# Altium PCB RemoteSensorUnit-v1.0.PcbDoc (part 3 of 5)
Units mm, origin at the board's own origin, x right, y up, seen from the top; angles counter-clockwise.
Board outline 80 x 114 mm, 2 copper layers (Top Layer, Bottom Layer), stack 1.448 mm thick; 163 components, 122 nets, 631 pads, 300 vias.
Unrouted connection lines stored in the file: 147.
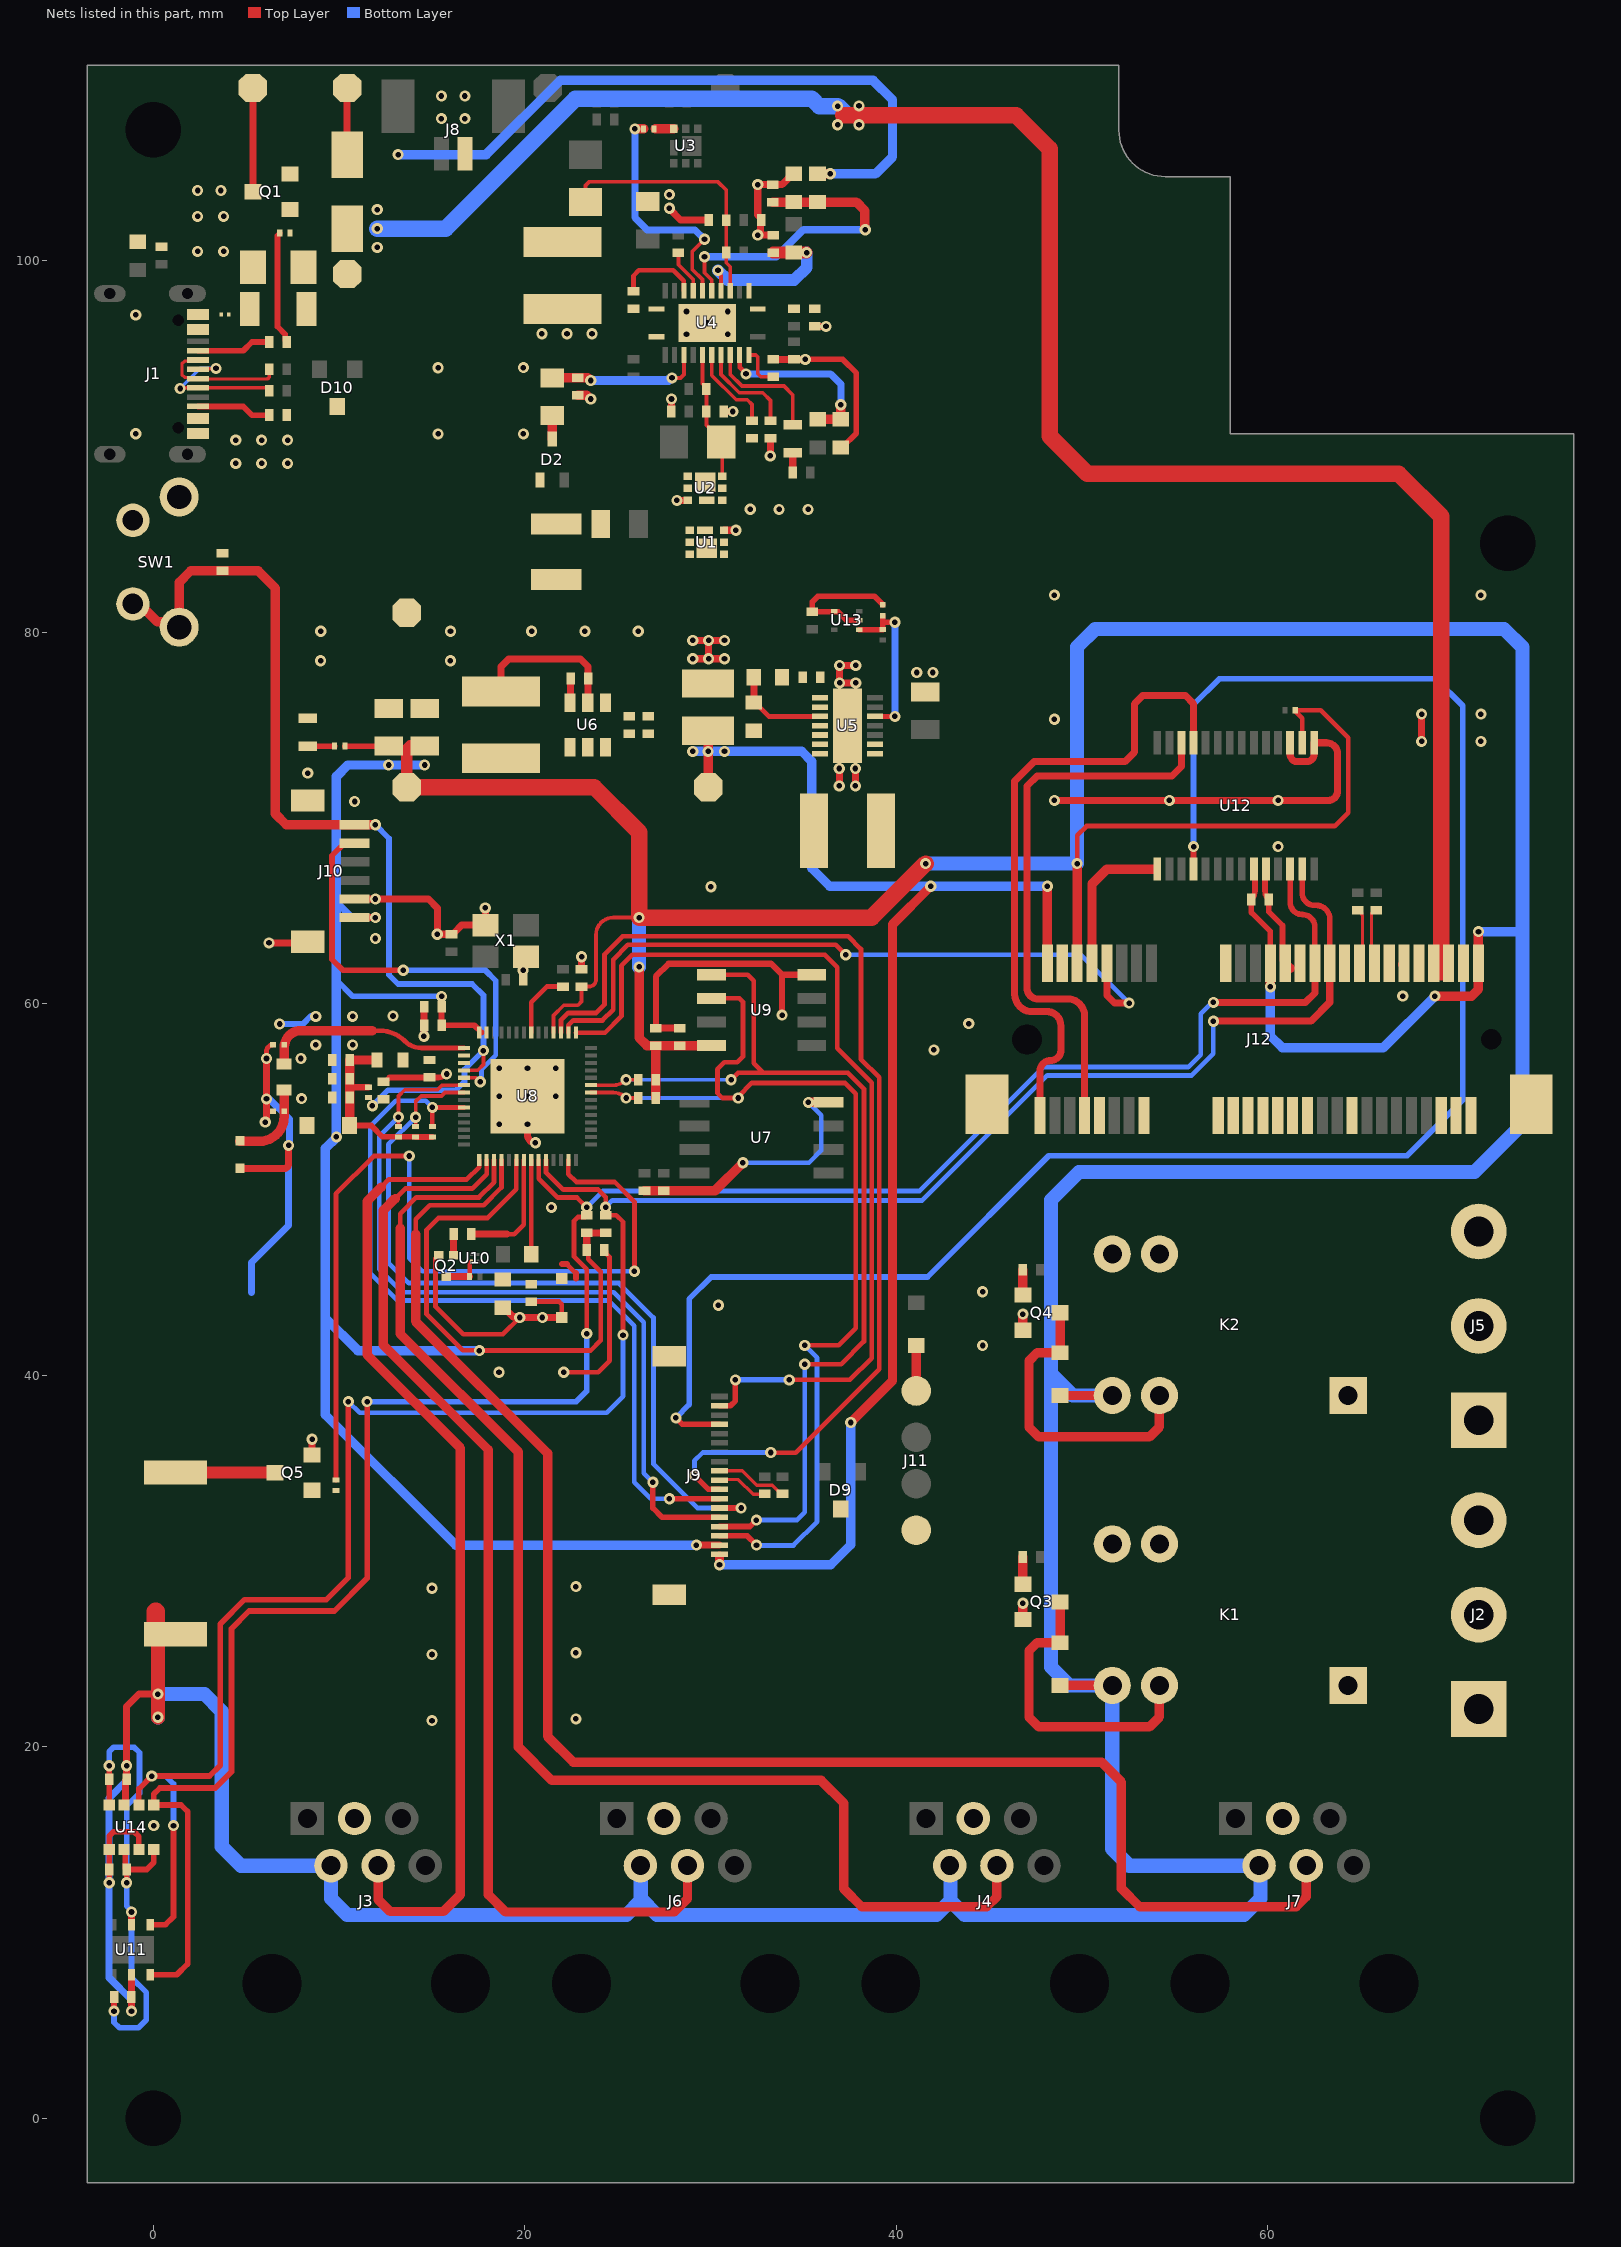
[diagram p2: the nets of this part, all layers, seen from the top]

## Part data (continued)
R7: library part RT0402BRD07232KL, "RES 232K OHM 0.1% 1/16W 0402", LCSC Part Number=C852652, Manufacturer=Yageo, Supplier Part Number=603-RT0402BRD07232KL, Category="Chip SMD Resistors", ComponentLink1Description=https://datasheet.octopart.com/RT0402BRD07232KL-Yageo-datasheet-166250672.pdf?src-supplier=Future+Electronics, ComponentLink1URL=https://datasheet.octopart.com/RT0402BRD07232KL-Yageo-datasheet-166250672.pdf?src-supplier=Future+Electronics, Item Type=Resistor, Manufacturer Part Number=RT0402BRD07232KL, Pricing="1=0.47, 10=0.338, 50=0.338, 100=0.135, 1000=0.067, 10000=0.048 (USD)", RoHS=Yes, Stock=9850, Supplier=Mouser
R8: library part PA1206FRF470R02L, "RES 0.02 OHM 1% 1W 1206", LCSC Part Number=C728292, Manufacturer=Yageo, Supplier Part Number=58AK7653, Category="Chip SMD Resistors", Item Type=Resistor, Manufacturer Part Number=PA1206FRF470R02L, Pricing="1=0.541 (USD)", RoHS=No, Stock=4000, Supplier=Avnet
R9: library part RC0402FR-0743KL, "RES 43K OHM 1% 1/16W 0402", Case Code (Imperial)=0402, Case Code (Metric)=1005, LCSC Part Number=C185415, Manufacturer=Yageo, Max Operating Temperature=155°C, Max Power Dissipation=63mW, Min Operating Temperature=-55°C, Package Quantity=1, Resistance=43kR, Resistance Tolerance=1%, Resistor Type="Thick Film", Supplier Part Number 1=311-43.0KLRCT-ND, Temperature Coefficient=100ppm/°C, Voltage Rating=50V, Case/Package=0402, Category="Chip SMD Resistors", ComponentLink1Description=https://datasheet.ciiva.com/11819/0900766b80c66297-11819515.pdf?src-supplier=RSComponents, ComponentLink1URL=https://datasheet.ciiva.com/11819/0900766b80c66297-11819515.pdf?src-supplier=RSComponents, ComponentLink2Description=https://datasheet.ciiva.com/7850/1018594-7850009.pdf?src-supplier=Element14, ComponentLink2URL=https://datasheet.ciiva.com/7850/1018594-7850009.pdf?src-supplier=Element14, ComponentLink3Description=https://datasheet.ciiva.com/7850/1018594-7850008.pdf?src-supplier=Element14, ComponentLink3URL=https://datasheet.ciiva.com/7850/1018594-7850008.pdf?src-supplier=Element14, ComponentLink4Description=https://datasheet.ciiva.com/2453/pyu-r-int-thick-7-2453665.pdf?src-supplier=Digi-Key, ComponentLink4URL=https://datasheet.ciiva.com/2453/pyu-r-int-thick-7-2453665.pdf?src-supplier=Digi-Key, ComponentLink5Description=https://datasheet.ciiva.com/2453/pyu-r-int-thick-7-2453666.pdf?src-supplier=Digi-Key, ComponentLink5URL=https://datasheet.ciiva.com/2453/pyu-r-int-thick-7-2453666.pdf?src-supplier=Digi-Key, ComponentLink6Description=https://datasheet.ciiva.com/2453/pyu-r-int-thick-7-2453664.pdf?src-supplier=Digi-Key, ComponentLink6URL=https://datasheet.ciiva.com/2453/pyu-r-int-thick-7-2453664.pdf?src-supplier=Digi-Key, Construction=Rectangular, Depth=0.5mm, Features="Moisture Resistant", Height=0.016inch, Item Type=Resistor, Lead Free="Lead Free", Length=1mm, Manufacturer Part Number=RC0402FR-0743KL, Military Standard=Not, Number of Terminations=2, Packaging="Tape and Reel", Power Rating=63mW, Pricing 1="1=0.10000, 10=0.01400, 100=0.00580, 1000=0.00262, 2500=0.00228, 5000=0.00188 (USD)", RoHS=Yes, RoHS Compliant=Yes, Series=RC, Size Code=0402, Stock 1=923044, Supplier 1=Digi-Key, Technology="THICK FILM", Termination=SMD/SMT, Tolerance=1%, Voltage Rating (DC)=50V, Weight=2.3E-05oz, Width=0.02inch
R10: library part RT0402BRD0715KL, "RES SMD 15K OHM 0.1% 1/16W 0402", LCSC Part Number=C852545, Manufacturer=Yageo, Category="Chip SMD Resistors", ComponentLink1Description=https://datasheet.ciiva.com/12723/pyu-rt-1-to-0-05-rohs-l-4-12723782.pdf?src-supplier=Mouser, ComponentLink1URL=https://datasheet.ciiva.com/12723/pyu-rt-1-to-0-05-rohs-l-4-12723782.pdf?src-supplier=Mouser, ComponentLink2Description=https://datasheet.ciiva.com/2582/pyu-rt-1-to-0-05-rohs-l-5-2582151.pdf?src-supplier=Digi-Key, ComponentLink2URL=https://datasheet.ciiva.com/2582/pyu-rt-1-to-0-05-rohs-l-5-2582151.pdf?src-supplier=Digi-Key, Item Type=Resistor, Manufacturer Part Number=RT0402BRD0715KL, Pricing="10000=0.0361, 30000=0.0357, 50000=0.0243, 100000=0.0205 (USD)", RoHS=Yes, Stock=10000, Supplier="Arrow Electronics", Supplier Part Number=RT0402BRD0715KL
R11 R22 R29 R34 R35 R36 R43: library part RC0201FR-0710KL, "RES SMD 10K OHM 1% 1/20W 0201", LCSC Part Number=C106225, Manufacturer=Yageo, Package=0201, ComponentLink7Description=LCSC, ComponentLink7URL=https://www.lcsc.com/product-detail/Chip-Resistor-Surface-Mount_YAGEO-RC0201FR-0710KL_C106225.html, Item Type=Resistor, Manufacturer Part Number=RC0201FR-0710KL
R12 R38 R44: library part RC0201FR-071KP, "RES 1K OHM 1% 1/20W 0201", LCSC Part Number=C3953443, Manufacturer=Yageo, Supplier Part Number 1=13-RC0201FR-071KPCT-ND, Manufacturer Part Number=RC0201FR-071KP, Pricing 1="1=0.11000, 10=0.10200, 100=0.03940, 1000=0.01734, 2500=0.01497, 5000=0.01340 (USD)", RoHS=Yes, RoHS Compliant=Yes, Stock 1=4800, Supplier 1=Digi-Key
R13: library part TNPW080510R0FEEA, "RES 10 OHM 1% 1/8W 0805", Case Code (Imperial)=0805, Case Code (Metric)=2012, LCSC Part Number=C844061, Manufacturer=Vishay, Max Operating Temperature=125°C, Min Operating Temperature=-55°C, Power Rating=125mW, Resistor Type="Thin Film", Supplier Part Number 1=71-TNPW080510R0FEEA, Temperature Coefficient=25ppm/°C, Tolerance=1%, Voltage Rating=150V, Case/Package=0805, Category="Chip SMD Resistors", ComponentLink1Description=https://datasheet.ciiva.com/16787/70201627-16787918.pdf?src-supplier=Allied+Electronics, ComponentLink1URL=https://datasheet.ciiva.com/16787/70201627-16787918.pdf?src-supplier=Allied+Electronics, Contact Plating=Tin, Depth=1.25mm, Height=0.45mm, Item Type=Resistor, Lead Free="Lead Free", Length=2mm, Manufacturer Part Number=TNPW080510R0FEEA, Mounting Technology="Surface Mount", Packaging="Tape and Reel", Pricing 1="1=0.57000, 10=0.43800, 50=0.43800, 100=0.18500, 500=0.13400, 1000=0.10200, 2500=0.09600, 5000=0.08500, 10000=0.08500 (USD)", Radiation Hardening=No, RoHS=Yes, RoHS Compliant=Yes, Series="TNPW e3", Stock 1=22670, Supplier 1=Mouser, Technology="THIN FILM", Termination=SMD/SMT, Weight=0.000194oz, Width=1.2mm
R15 R16: library part RC0402FR-074K02L, "RES 4.02K OHM 1% 1/16W 0402", Case Code (Imperial)=0402, Case Code (Metric)=1005, LCSC Part Number=C137968, Manufacturer=Yageo, Max Operating Temperature=155°C, Max Power Dissipation=63mW, Min Operating Temperature=-55°C, Package Quantity=1, Power Rating=62.5mW, Resistance=4.02kR, Resistor Type="Thick Film", Supplier Part Number 1=603-RC0402FR-074K02L, Temperature Coefficient=100ppm/°C, Tolerance=1%, Voltage Rating=50V, Case/Package=0402, Category="Chip SMD Resistors", ComponentLink1Description=https://datasheet.ciiva.com/2553/pyu-r-int-thick-7-2553258.pdf?src-supplier=Digi-Key, ComponentLink1URL=https://datasheet.ciiva.com/2553/pyu-r-int-thick-7-2553258.pdf?src-supplier=Digi-Key, ComponentLink2Description=https://datasheet.ciiva.com/2553/pyu-r-int-thick-7-2553259.pdf?src-supplier=Digi-Key, ComponentLink2URL=https://datasheet.ciiva.com/2553/pyu-r-int-thick-7-2553259.pdf?src-supplier=Digi-Key, ComponentLink3Description=https://datasheet.ciiva.com/2553/pyu-r-int-thick-7-2553257.pdf?src-supplier=Digi-Key, ComponentLink3URL=https://datasheet.ciiva.com/2553/pyu-r-int-thick-7-2553257.pdf?src-supplier=Digi-Key, ComponentLink4Description=https://datasheet.ciiva.com/12668/pyu-rc0402-51-rohs-l-6-r-12668204.pdf?src-supplier=Mouser, ComponentLink4URL=https://datasheet.ciiva.com/12668/pyu-rc0402-51-rohs-l-6-r-12668204.pdf?src-supplier=Mouser, ComponentLink5Description=https://datasheet.ciiva.com/16741/pyu-rc0402-51-rohs-l-6-r-16741438.pdf?src-supplier=Future+Electronics, ComponentLink5URL=https://datasheet.ciiva.com/16741/pyu-rc0402-51-rohs-l-6-r-16741438.pdf?src-supplier=Future+Electronics, Construction=Rectangular, Contact Plating=Tin,Matte, Depth=0.5mm, Features="Moisture Resistant", Height=0.016inch, Lead Free="Lead Free", Length=1mm, Manufacturer Part Number=RC0402FR-074K02L, Military Standard=Not, Number of Terminations=2, Packaging="Tape and Reel", Pricing 1="1=0.10000, 10=0.01200, 50=0.01200, 100=0.00500, 1000=0.00300, 2500=0.00200, 10000=0.00100 (USD)", RoHS=Yes, RoHS Compliant=Yes, Series=RC, Stock 1=302754, Supplier 1=Mouser, Technology="THICK FILM", Termination=SMD/SMT, Width=0.02inch, Working Voltage=50V
R17: library part PE1206FRM470R01L, "RES 0.01 OHM 1% 1W 1206", LCSC Part Number=C875668, Manufacturer=Yageo, Supplier Part Number=13-PE1206FRM470R01LCT-ND, Category="Chip SMD Resistors", ComponentLink1Description=http://www.mouser.com/ds/2/447/PYu-PE_521_RoHS_L_5-1077989.pdf?src-supplier=Mouser, ComponentLink1URL=http://www.mouser.com/ds/2/447/PYu-PE_521_RoHS_L_5-1077989.pdf?src-supplier=Mouser, ComponentLink2Description=http://www.yageo.com/documents/recent/PYu-PE_521_RoHS_L_5.pdf?src-supplier=Digi-Key, ComponentLink2URL=http://www.yageo.com/documents/recent/PYu-PE_521_RoHS_L_5.pdf?src-supplier=Digi-Key, ComponentLink3Description=https://datasheet.octopart.com/PE1206FRM470R01L-Yageo-datasheet-152583588.pdf?src-supplier=Future+Electronics, ComponentLink3URL=https://datasheet.octopart.com/PE1206FRM470R01L-Yageo-datasheet-152583588.pdf?src-supplier=Future+Electronics, Item Type=Resistor, Manufacturer Part Number=PE1206FRM470R01L, Pricing="1=0.8, 10=0.692, 25=0.608, 50=0.5556, 100=0.4823, 250=0.41936, 500=0.34806, 1000=0.28306 (USD)", RoHS=Yes, Stock=18092, Supplier=Digi-Key
R18: library part RC0402FR-0739KL, "RES 39K OHM 1% 1/16W 0402", Case Code (Imperial)=0402, Case Code (Metric)=1005, LCSC Part Number=C137995, Manufacturer=Yageo, Max Operating Temperature=155°C, Max Power Dissipation=63mW, Min Operating Temperature=-55°C, Package Quantity=1, Resistance=39kR, Resistance Tolerance=1%, Resistor Type="Thick Film", Supplier Part Number 1=603-RC0402FR-0739KL, Temperature Coefficient=100ppm/°C, Voltage Rating=50V, Case/Package=0402, Category="Chip SMD Resistors", ComponentLink1Description=https://datasheet.ciiva.com/11819/0900766b80c66297-11819480.pdf?src-supplier=RSComponents, ComponentLink1URL=https://datasheet.ciiva.com/11819/0900766b80c66297-11819480.pdf?src-supplier=RSComponents, ComponentLink2Description=https://datasheet.ciiva.com/2553/pyu-r-int-thick-7-2553207.pdf?src-supplier=Digi-Key, ComponentLink2URL=https://datasheet.ciiva.com/2553/pyu-r-int-thick-7-2553207.pdf?src-supplier=Digi-Key, ComponentLink3Description=https://datasheet.ciiva.com/2553/pyu-r-int-thick-7-2553208.pdf?src-supplier=Digi-Key, ComponentLink3URL=https://datasheet.ciiva.com/2553/pyu-r-int-thick-7-2553208.pdf?src-supplier=Digi-Key, ComponentLink4Description=https://datasheet.ciiva.com/2553/pyu-r-int-thick-7-2553206.pdf?src-supplier=Digi-Key, ComponentLink4URL=https://datasheet.ciiva.com/2553/pyu-r-int-thick-7-2553206.pdf?src-supplier=Digi-Key, ComponentLink5Description=https://datasheet.ciiva.com/12668/pyu-rc0402-51-rohs-l-6-r-12668186.pdf?src-supplier=Mouser, ComponentLink5URL=https://datasheet.ciiva.com/12668/pyu-rc0402-51-rohs-l-6-r-12668186.pdf?src-supplier=Mouser, ComponentLink6Description=https://datasheet.ciiva.com/7849/1018594-7849980.pdf?src-supplier=Element14, ComponentLink6URL=https://datasheet.ciiva.com/7849/1018594-7849980.pdf?src-supplier=Element14, ComponentLink7Description=https://datasheet.ciiva.com/7849/1018594-7849981.pdf?src-supplier=Element14, ComponentLink7URL=https://datasheet.ciiva.com/7849/1018594-7849981.pdf?src-supplier=Element14, ComponentLink8Description=https://datasheet.ciiva.com/16941/pyu-rc0402-51-rohs-l-6-r-16941400.pdf?src-supplier=Future+Electronics, ComponentLink8URL=https://datasheet.ciiva.com/16941/pyu-rc0402-51-rohs-l-6-r-16941400.pdf?src-supplier=Future+Electronics, Construction=Rectangular, Depth=0.5mm, Features="Moisture Resistant", Height=0.016inch, Lead Free="Lead Free", Length=1mm, Manufacturer Part Number=RC0402FR-0739KL, Military Standard=Not, Number of Terminations=2, Packaging="Tape and Reel", Power Rating=63mW, Pricing 1="1=0.10000, 10=0.01200, 50=0.01200, 100=0.00500, 1000=0.00300, 2500=0.00200, 10000=0.00100 (USD)", REACH SVHC=Unknown, RoHS=Yes, RoHS Compliant=Yes, Series=RC, Size Code=0402, Stock 1=177055, Supplier 1=Mouser, Technology="THICK FILM", Termination=SMD/SMT, Tolerance=1%, Width=0.02inch
R19: library part FRC0603F5231TS, "100mW Thick Film Resistors ±1% 5.23kΩ 0603 Chip Resistor - Surface Mount ROHS", LCSC Part Number=C2930111, Manufacturer=FOJAN, Package=0603, ComponentLink1Description=LCSC, ComponentLink1URL=https://www.lcsc.com/product-detail/Chip-Resistor-Surface-Mount_FOJAN-FRC0603F5231TS_C2930111.html, Item Type=Resistor, Manufacturer Part Number=FRC0603F5231TS
R20: library part RC0603FR-0730K1L, "RES 30.1K OHM 1% 1/10W 0603", LCSC Part Number=C137745, Manufacturer=Yageo, Supplier Part Number=5666516, Category="Chip SMD Resistors", ComponentLink1Description=https://datasheet.ciiva.com/11808/0900766b80f96399-11808101.pdf?src-supplier=Rs, ComponentLink1URL=https://datasheet.ciiva.com/11808/0900766b80f96399-11808101.pdf?src-supplier=Rs, Item Type=Resistor, Manufacturer Part Number=RC0603FR-0730K1L, Pricing="5000=0.0015, 50000=0.0014, 200000=0.0014, 625000=0.0013, 2000000=0.0012 (USD)", RoHS=Yes, Stock=2160000, Supplier="Future Electronics"
R21: library part RC0402FR-071K5L, "RES 1.5K OHM 1% 1/16W 0402", Case Code (Imperial)=0402, Case Code (Metric)=1005, LCSC Part Number=C114759, Manufacturer=Yageo, Max Operating Temperature=155°C, Max Power Dissipation=63mW, Min Operating Temperature=-55°C, Package Quantity=1, Power Rating=62.5mW, Resistance=1.5kR, Resistance Tolerance=1%, Resistor Type="Thick Film", Supplier Part Number 1=311-1.50KLRCT-ND, Temperature Coefficient=100ppm/°C, Voltage Rating=50V, Case/Package=0402, Category="Chip SMD Resistors", ComponentLink1Description=https://datasheet.ciiva.com/11808/0900766b80c66297-11808238.pdf?src-supplier=RSComponents, ComponentLink1URL=https://datasheet.ciiva.com/11808/0900766b80c66297-11808238.pdf?src-supplier=RSComponents, ComponentLink2Description=https://datasheet.ciiva.com/46394/1018594-46394950.pdf?src-supplier=Element14, ComponentLink2URL=https://datasheet.ciiva.com/46394/1018594-46394950.pdf?src-supplier=Element14, ComponentLink3Description=https://datasheet.ciiva.com/2453/pyu-r-int-thick-7-2453440.pdf?src-supplier=Digi-Key, ComponentLink3URL=https://datasheet.ciiva.com/2453/pyu-r-int-thick-7-2453440.pdf?src-supplier=Digi-Key, ComponentLink4Description=https://datasheet.ciiva.com/2453/pyu-r-int-thick-7-2453441.pdf?src-supplier=Digi-Key, ComponentLink4URL=https://datasheet.ciiva.com/2453/pyu-r-int-thick-7-2453441.pdf?src-supplier=Digi-Key, ComponentLink5Description=https://datasheet.ciiva.com/2453/pyu-r-int-thick-7-2453439.pdf?src-supplier=Digi-Key, ComponentLink5URL=https://datasheet.ciiva.com/2453/pyu-r-int-thick-7-2453439.pdf?src-supplier=Digi-Key, ComponentLink6Description=https://datasheet.ciiva.com/12558/pyu-rc0402-51-rohs-l-6-r-8721-12558542.pdf?src-supplier=Mouser, ComponentLink6URL=https://datasheet.ciiva.com/12558/pyu-rc0402-51-rohs-l-6-r-8721-12558542.pdf?src-supplier=Mouser, ComponentLink7Description=https://datasheet.ciiva.com/7849/1018594-7849863.pdf?src-supplier=Element14, ComponentLink7URL=https://datasheet.ciiva.com/7849/1018594-7849863.pdf?src-supplier=Element14, ComponentLink8Description=https://datasheet.ciiva.com/7849/1018594-7849864.pdf?src-supplier=Element14, ComponentLink8URL=https://datasheet.ciiva.com/7849/1018594-7849864.pdf?src-supplier=Element14, ComponentLink9Description=https://datasheet.ciiva.com/15189/getdatasheetpartid-323992-15189370.pdf?src-supplier=Verical, ComponentLink9URL=https://datasheet.ciiva.com/15189/getdatasheetpartid-323992-15189370.pdf?src-supplier=Verical, Construction=Rectangular, Depth=0.5mm, Features="Moisture Resistant", Height=0.016inch, Lead Free="Lead Free", Length=1mm, Manufacturer Part Number=RC0402FR-071K5L, Military Standard=Not, Number of Terminations=2, Packaging="Tape and Reel", Pricing 1="1=0.10000, 10=0.01500, 100=0.00610, 1000=0.00275, 2500=0.00239, 5000=0.00197 (USD)", REACH SVHC="No SVHC", RoHS=Yes, RoHS Compliant=Yes, Series=RC, Size Code=0402, Stock 1=2832947, Supplier 1=Digi-Key, Technology="THICK FILM", Termination=SMD/SMT, Tolerance=1%, Width=0.02inch
R23: library part RT0603BRE07680KL, "Res Thin Film 0603 680K Ohm 0.1% 1/10W ±50ppm/°C Molded SMD SMD Paper T/R", Case/Package=0603, LCSC Part Number=C862257, Manufacturer=Yageo, Max Operating Temperature=155°C, Max Power Dissipation=100mW, Min Operating Temperature=-55°C, Supplier Part Number=RT0603BRE07680KL-ND, Temperature Coefficient=50ppm/°C, Tolerance=0.1%, Category="Chip SMD Resistors", ComponentLink1Description=http://www.yageo.com/documents/recent/PYu-RT_1-to-0.05_RoHS_L_6.pdf?src-supplier=Avnet, ComponentLink1URL=http://www.yageo.com/documents/recent/PYu-RT_1-to-0.05_RoHS_L_6.pdf?src-supplier=Avnet, ComponentLink2Description=http://www.yageo.com/documents/recent/PYu-RT_1-to-0.01_RoHS_L_8.pdf?src-supplier=Digi-Key, ComponentLink2URL=http://www.yageo.com/documents/recent/PYu-RT_1-to-0.01_RoHS_L_8.pdf?src-supplier=Digi-Key, ComponentLink3Description=LCSC, ComponentLink3URL=https://www.lcsc.com/product-detail/Chip-Resistor-Surface-Mount_YAGEO-RT0603BRE07680KL_C862257.html, Contact Plating=Tin,Matte, Item Type=Resistor, Manufacturer Part Number=RT0603BRE07680KL, Number of Terminations=2, Packaging="Tape and Reel", Pricing="5000=0.04588 (USD)", RoHS=Yes, RoHS Compliant=Yes, Series=RT, Supplier=Digi-Key
R25: library part RC0201JR-07470RL, "RES 470 OHM 5% 1/20W 0201", Case Code (Imperial)=0201, Case Code (Metric)=0603, LCSC Part Number=C163491, Manufacturer=Yageo, Max Operating Temperature=125°C, Max Power Dissipation=50mW, Min Operating Temperature=-55°C, Package Quantity=1, Resistor Type="Thick Film", Supplier Part Number 1=311-470NCT-ND, Temperature Coefficient=200ppm/°C, Tolerance=5%, Voltage Rating=25V, Case/Package=0201, Category="Chip SMD Resistors", ComponentLink1Description=https://datasheet.ciiva.com/5924/443682-5924928.pdf?src-supplier=Farnell, ComponentLink1URL=https://datasheet.ciiva.com/5924/443682-5924928.pdf?src-supplier=Farnell, ComponentLink2Description=https://datasheet.ciiva.com/8885/pyu-rc0201-51-rohs-l-8-8885600.pdf?src-supplier=Avnet, ComponentLink2URL=https://datasheet.ciiva.com/8885/pyu-rc0201-51-rohs-l-8-8885600.pdf?src-supplier=Avnet, ComponentLink3Description=https://datasheet.ciiva.com/28390/pyu-rc0201-51-rohs-l-8-28390376.pdf?src-supplier=Avnet+Europe, ComponentLink3URL=https://datasheet.ciiva.com/28390/pyu-rc0201-51-rohs-l-8-28390376.pdf?src-supplier=Avnet+Europe, ComponentLink4Description=https://datasheet.ciiva.com/8885/pyu-rc0201-51-rohs-l-8-8885642.pdf?src-supplier=Avnet, ComponentLink4URL=https://datasheet.ciiva.com/8885/pyu-rc0201-51-rohs-l-8-8885642.pdf?src-supplier=Avnet, ComponentLink5Description=https://datasheet.ciiva.com/2462/pyu-r-int-thick-7-2462802.pdf?src-supplier=Digi-Key, ComponentLink5URL=https://datasheet.ciiva.com/2462/pyu-r-int-thick-7-2462802.pdf?src-supplier=Digi-Key, ComponentLink6Description=https://datasheet.ciiva.com/2462/pyu-r-int-thick-7-2462803.pdf?src-supplier=Digi-Key, ComponentLink6URL=https://datasheet.ciiva.com/2462/pyu-r-int-thick-7-2462803.pdf?src-supplier=Digi-Key, ComponentLink7Description=https://datasheet.ciiva.com/2462/pyu-r-int-thick-7-2462804.pdf?src-supplier=Digi-Key, ComponentLink7URL=https://datasheet.ciiva.com/2462/pyu-r-int-thick-7-2462804.pdf?src-supplier=Digi-Key, Contact Plating=Tin,Matte, Depth=0.3mm, Features="Moisture Resistant", Height=0.01inch, Lead Free="Lead Free", Length=0.6mm, Manufacturer Part Number=RC0201JR-07470RL, Military Standard=Not, Number of Pins=2, Number of Terminations=2, Packaging="Tape and Reel", Power Rating=50mW, Pricing 1="1=0.10000, 10=0.02600, 100=0.01040, 1000=0.00466, 2500=0.00405, 5000=0.00334 (USD)", Radiation Hardening=No, REACH SVHC="No SVHC", Resistance=470R, RoHS=Yes, Stock 1=173754, Supplier 1=Digi-Key, Termination=SMD/SMT, Voltage Rating (DC)=25V, Width=0.3mm
R26: library part RC0402FR-07499RL, "RES 499 OHM 1% 1/16W 0402", Case Code (Imperial)=0402, Case Code (Metric)=1005, LCSC Part Number=C137970, Manufacturer=Yageo, Max Operating Temperature=155°C, Max Power Dissipation=63mW, Min Operating Temperature=-55°C, Package Quantity=1, Power Rating=62.5mW, Resistance Tolerance=1%, Resistor Type="Thick Film", Supplier Part Number 1=603-RC0402FR-07499RL, Temperature Coefficient=100ppm/°C, Voltage Rating=50V, Case/Package=0402, Category="Chip SMD Resistors", ComponentLink1Description=https://datasheet.ciiva.com/2453/pyu-r-int-thick-7-2453539.pdf?src-supplier=Digi-Key, ComponentLink1URL=https://datasheet.ciiva.com/2453/pyu-r-int-thick-7-2453539.pdf?src-supplier=Digi-Key, ComponentLink2Description=https://datasheet.ciiva.com/2453/pyu-r-int-thick-7-2453540.pdf?src-supplier=Digi-Key, ComponentLink2URL=https://datasheet.ciiva.com/2453/pyu-r-int-thick-7-2453540.pdf?src-supplier=Digi-Key, ComponentLink3Description=https://datasheet.ciiva.com/2453/pyu-r-int-thick-7-2453538.pdf?src-supplier=Digi-Key, ComponentLink3URL=https://datasheet.ciiva.com/2453/pyu-r-int-thick-7-2453538.pdf?src-supplier=Digi-Key, Construction=Rectangular, Depth=0.5mm, Features="Moisture Resistant", Height=0.016inch, Lead Free="Lead Free", Length=1mm, Manufacturer Part Number=RC0402FR-07499RL, Military Standard=Not, Number of Terminations=2, Packaging="Tape and Reel", Pricing 1="1=0.10000, 10=0.01200, 50=0.01200, 100=0.00500, 1000=0.00300, 10000=0.00100 (USD)", REACH SVHC="No SVHC", Resistance=499R, RoHS=Yes, RoHS Compliant=Yes, Series=RC, Size Code=0402, Stock 1=936879, Supplier 1=Mouser, Termination=SMD/SMT, Tolerance=1%, Voltage Rating (DC)=50V, Width=0.02inch
R27 R28 R32 R33 R39 R41 R42: library part RC0402FR-074K7L, "RES 4.7K OHM 1% 1/16W 0402", Case Code (Imperial)=0402, Case Code (Metric)=1005, LCSC Part Number=C105871, Manufacturer=Yageo, Max Operating Temperature=155°C, Max Power Dissipation=63mW, Min Operating Temperature=-55°C, Power Rating=62.5mW, Resistance=4.7kR, Resistance Tolerance=1%, Resistor Type="Thick Film", Temperature Coefficient=100ppm/°C, Voltage Rating=50V, Case/Package=0402, Category="Chip SMD Resistors", ComponentLink1Description=https://datasheet.ciiva.com/22661/1686128-22661342.pdf?src-supplier=Element14, ComponentLink1URL=https://datasheet.ciiva.com/22661/1686128-22661342.pdf?src-supplier=Element14, ComponentLink2Description=https://datasheet.ciiva.com/7850/1018594-7850022.pdf?src-supplier=Element14, ComponentLink2URL=https://datasheet.ciiva.com/7850/1018594-7850022.pdf?src-supplier=Element14, ComponentLink3Description=https://datasheet.ciiva.com/7850/1018594-7850023.pdf?src-supplier=Element14, ComponentLink3URL=https://datasheet.ciiva.com/7850/1018594-7850023.pdf?src-supplier=Element14, ComponentLink4Description=https://datasheet.ciiva.com/15215/getdatasheetpartid-328119-15215035.pdf?src-supplier=Verical, ComponentLink4URL=https://datasheet.ciiva.com/15215/getdatasheetpartid-328119-15215035.pdf?src-supplier=Verical, Construction=Rectangular, Depth=0.5mm, Features="Moisture Resistant", Height=0.32mm, Height - Seated (Max)=0.016inch, Item Type=Resistor, Lead Free="Lead Free", Length=1mm, Manufacturer Part Number=RC0402FR-074K7L, Military Standard=Not, Number of Pins=2, Number of Terminations=2, Packaging="Tape and Reel", Pricing 1="10000=0.00085 (USD)", Reach SVHC Compliant=Yes, RoHS=Yes, RoHS Compliant=Yes, Series=RC, Size Code=0402, Stock 1=2420000, Supplier 1=Avnet, Supplier Part Number 1=RC0402FR-074K7L, Termination=SMD/SMT, Tolerance=1%, Voltage Rating (DC)=50V, Width=0.5mm
R47: library part RC1210JR-072RL, "RES 2 OHM 5% 1/2W 1210", Case Code (Imperial)=1210, Case Code (Metric)=3225, LCSC Part Number=C114691, Manufacturer=Yageo, Max Operating Temperature=155°C, Max Power Dissipation=500mW, Min Operating Temperature=-55°C, Resistor Type="Thick Film", Supplier Part Number 1=603-RC1210JR-072RL, Temperature Coefficient=200ppm/°C, Tolerance=5%, Voltage Rating=200V, Case/Package=1210, Category="Chip SMD Resistors", ComponentLink1Description=https://datasheet.ciiva.com/16741/pyu-rc1210-51-rohs-l-4-16741479.pdf?src-supplier=Future+Electronics, ComponentLink1URL=https://datasheet.ciiva.com/16741/pyu-rc1210-51-rohs-l-4-16741479.pdf?src-supplier=Future+Electronics, Construction=Rectangular, Depth=2.6mm, Features="Moisture Resistant", Height=0.024inch, Lead Free="Lead Free", Length=3.1mm, Manufacturer Part Number=RC1210JR-072RL, Military Standard=Not, Number of Terminations=2, Packaging="Tape and Reel", Power Rating=500mW, Pricing 1="1=0.29000, 10=0.25000, 50=0.25000, 100=0.09800, 1000=0.04800, 10000=0.03200 (USD)", Resistance=2R, RoHS=Yes, RoHS Compliant=Yes, Series=RC, Stock 1=3816, Supplier 1=Mouser, Termination=SMD/SMT, Width=2.6mm
R48: library part RC0805FR-070RL, "RES 0 OHM JUMPER 1/8W 0805", Case Code (Imperial)=0805, Case Code (Metric)=2012, LCSC Part Number=C100045, Manufacturer=Yageo, Max Operating Temperature=155°C, Max Power Dissipation=125mW, Min Operating Temperature=-55°C, Resistance=0mR, Resistor Type="Thick Film", Tolerance=1%, Case/Package=0805, Category="Chip SMD Resistors", ComponentLink1Description=https://datasheet.ciiva.com/15189/getdatasheetpartid-348154-15189885.pdf?src-supplier=Verical, ComponentLink1URL=https://datasheet.ciiva.com/15189/getdatasheetpartid-348154-15189885.pdf?src-supplier=Verical, ComponentLink2Description=https://datasheet.ciiva.com/17042/rc0805-17042698.pdf?src-supplier=Future+Electronics, ComponentLink2URL=https://datasheet.ciiva.com/17042/rc0805-17042698.pdf?src-supplier=Future+Electronics, Construction=Rectangular, Contact Plating=Tin,Matte, Depth=1.25mm, Features="Moisture Resistant", Item Type=Resistor, Lead Free="Lead Free", Length=2mm, Manufacturer Part Number=RC0805FR-070RL, Military Standard=Not, Number of Terminations=2, Packaging="Tape and Reel", Power Rating=125mW, Pricing 1="5000=0.00281, 10000=0.00277, 20000=0.00269 (USD)", Radiation Hardening=No, RoHS=Yes, RoHS Compliant=Yes, Series=RC, Size Code=0805, Stock 1=85000, Supplier 1=Avnet, Supplier Part Number 1=RC0805FR-070RL
SW1: "50mA Lying SPST 24V Plugin Tactile Switches ROHS", Manufacturer="TE Connectivity", Category="Pushbutton Switches", ComponentLink1Description=https://datasheet.ciiva.com/30072/eng-cd-1825027-f-30072833.pdf?src-supplier=Onlinecomponents.com, ComponentLink1URL=https://datasheet.ciiva.com/30072/eng-cd-1825027-f-30072833.pdf?src-supplier=Onlinecomponents.com, ComponentLink2Description=https://datasheet.ciiva.com/16393/1825027-8-16393346.pdf?src-supplier=Future+Electronics, ComponentLink2URL=https://datasheet.ciiva.com/16393/1825027-8-16393346.pdf?src-supplier=Future+Electronics, ComponentLink3Description=https://datasheet.ciiva.com/8164/eng-cd-1825027-g4-8164921.pdf?src-supplier=Avnet, ComponentLink3URL=https://datasheet.ciiva.com/8164/eng-cd-1825027-g4-8164921.pdf?src-supplier=Avnet, Item Type="Tactile Switch", Manufacturer Part Number=1825027-8, Pricing 1="1=0.13800, 10=0.13370, 25=0.12590, 100=0.10940, 250=0.10570, 500=0.09520, 1000=0.07320, 2500=0.07250, 5000=0.06250 (USD)", RoHS=Yes, Stock 1=178529, Supplier 1="Arrow Electronics", Supplier Part Number 1=1825027-8
U1 U2: "30V 5A 2.3W 30mΩ@4A,8V null WSON-6 MOSFETs ROHS", LCSC Part Number=C2863837, Manufacturer="Texas Instruments", Supplier Part Number=595-CSD17313Q2, Category=MOSFETs, ComponentLink1Description=https://datasheet.ciiva.com/6388/csd17313q2-6388183.pdf?src-supplier=Digi-Key, ComponentLink1URL=https://datasheet.ciiva.com/6388/csd17313q2-6388183.pdf?src-supplier=Digi-Key, ComponentLink2Description=https://datasheet.ciiva.com/4438/slps260b-128048-4438543.pdf?src-supplier=Mouser, ComponentLink2URL=https://datasheet.ciiva.com/4438/slps260b-128048-4438543.pdf?src-supplier=Mouser, ComponentLink3Description=https://datasheet.ciiva.com/1255/csd17313q2-1255358.pdf?src-supplier=Newark, ComponentLink3URL=https://datasheet.ciiva.com/1255/csd17313q2-1255358.pdf?src-supplier=Newark, ComponentLink4Description=https://datasheet.ciiva.com/7968/1536237-7968249.pdf?src-supplier=Element14, ComponentLink4URL=https://datasheet.ciiva.com/7968/1536237-7968249.pdf?src-supplier=Element14, Item Type=IC, Manufacturer Part Number=CSD17313Q2, Pricing="1=0.59, 10=0.502, 50=0.502, 100=0.375, 1000=0.228, 10000=0.156 (USD)", RoHS=Yes, Stock=12528, Supplier=Mouser
U3: "MOSFET P-CH 20V 48A 6SON", LCSC Part Number=C468254, Manufacturer="Texas Instruments", Supplier Part Number=595-CSD25310Q2, Category="Integrated Circuits (ICs)", ComponentLink1Description=https://datasheet.ciiva.com/29747/csd25310q2-29747573.pdf?src-supplier=Digi-Key, ComponentLink1URL=https://datasheet.ciiva.com/29747/csd25310q2-29747573.pdf?src-supplier=Digi-Key, Item Type=Mosfet, Manufacturer Part Number=CSD25310Q2, Pricing="1=0.51, 10=0.438, 50=0.438, 100=0.327, 1000=0.198, 10000=0.136 (USD)", RoHS=Yes, Stock=10899, Supplier=Mouser
U4: "IC BATT CHG LI-ION 1-3CEL 24VQFN", LCSC Part Number=C44478, Manufacturer="Texas Instruments", Supplier Part Number=595-BQ24133RGYR, Category="Battery Management", ComponentLink1Description=https://datasheet.ciiva.com/15115/getdatasheetpartid-543747-15115273.pdf?src-supplier=Verical, ComponentLink1URL=https://datasheet.ciiva.com/15115/getdatasheetpartid-543747-15115273.pdf?src-supplier=Verical, ComponentLink2Description=https://datasheet.ciiva.com/1934/bq24133-1934706.pdf?src-supplier=Digi-Key, ComponentLink2URL=https://datasheet.ciiva.com/1934/bq24133-1934706.pdf?src-supplier=Digi-Key, ComponentLink3Description=https://datasheet.ciiva.com/3214/bq24133-3214134.pdf?src-supplier=Avnet, ComponentLink3URL=https://datasheet.ciiva.com/3214/bq24133-3214134.pdf?src-supplier=Avnet, Item Type=IC, Manufacturer Part Number=BQ24133RGYR, Pricing="1=3.03, 10=2.73, 50=2.73, 100=2.24, 1000=1.61, 10000=1.52 (USD)", RoHS=Yes, Stock=4511, Supplier=Mouser
U5: "IC REG BCK BST ADJ 4A 14WDFN", LCSC Part Number=C250400, Manufacturer=Richtek, Supplier Part Number=1028-1338-1-ND, Category="Voltage Regulators - Switching", ComponentLink1Description=http://www.farnell.com/datasheets/2045512.pdf?src-supplier=Element14, ComponentLink1URL=http://www.farnell.com/datasheets/2045512.pdf?src-supplier=Element14, ComponentLink2Description=https://www.richtek.com/assets/product_file/RT6154A=RT6154B/DS6154AB-01.pdf?src-supplier=Digi-Key, ComponentLink2URL=https://www.richtek.com/assets/product_file/RT6154A=RT6154B/DS6154AB-01.pdf?src-supplier=Digi-Key, Item Type=IC, Manufacturer Part Number=RT6154AGQW, Pricing="1=2.97, 10=2.668, 25=2.5176, 100=2.1448, 250=2.01392, 500=1.7622 (USD)", RoHS=Yes, Stock=7681, Supplier=Digi-Key
U6: "IC REG BUCK 3.3V 2A TSOT26", LCSC Part Number=C780769, Manufacturer=Diodes, Supplier Part Number=6109504, Category="Voltage Regulators - Switching", ComponentLink1Description=https://www.diodes.com/assets/Datasheets/AP63200-AP63201-AP63203-AP63205.pdf?src-supplier=Digi-Key, ComponentLink1URL=https://www.diodes.com/assets/Datasheets/AP63200-AP63201-AP63203-AP63205.pdf?src-supplier=Digi-Key, Item Type=IC, Manufacturer Part Number=AP63203WU-7, Pricing="3000=0.34, 6000=0.335, 9000=0.33, 12000=0.33, 15000=0.32 (USD)", RoHS=Yes, Stock=3000, Supplier="Future Electronics"
U7: "IC FLASH 64M SPI 133MHZ 8SOIC", Case/Package=SOIC, LCSC Part Number=C179171, Manufacturer=Winbond, Max Operating Temperature=85°C, Min Operating Temperature=-40°C, Category=Memory, ComponentLink1Description=http://www.winbond.com/resource-files/w25q64jv%20spi%20%20%20revc%2006032016%20kms.pdf?src-supplier=Digi-Key, ComponentLink1URL=http://www.winbond.com/resource-files/w25q64jv%20spi%20%20%20revc%2006032016%20kms.pdf?src-supplier=Digi-Key, ComponentLink2Description=http://www.winbond.com/resource-files/w25q64jv%20revj%2003272018%20plus.pdf?src-supplier=Digi-Key, ComponentLink2URL=http://www.winbond.com/resource-files/w25q64jv%20revj%2003272018%20plus.pdf?src-supplier=Digi-Key, Interface=SPI,Serial, Item Type=IC, Manufacturer Part Number="W25Q64JVSSIQ TR", Memory Format=FLASH,NOR, Packaging="Tape and Reel", Pricing 1="2000=0.8199, 4000=0.7715, 6000=0.7637, 10000=0.7635 (USD)", RoHS=Yes, Series=SpiFlash®, Stock 1=56000, Supplier 1="Arrow Electronics", Supplier Part Number 1="W25Q64JVSSIQ TR"
U8: "SMD IC ESP32-S3R8, DUAL-CORE MCU", Manufacturer="Espressif Systems", Supplier Part Number 1=356-ESP32-S3R8, Category="RF Receivers, Transceivers", Item Type=IC, Manufacturer Part Number=ESP32-S3R8, Pricing 1="1=2.46, 10=2.46, 50=2.46, 100=2.46, 1000=2.46, 10000=2.46 (USD)", RoHS=No, Stock 1=2366, Supplier 1=Mouser
U9: "IC AUTHENTICATION CHIP 8SOIC", LCSC Part Number=C5444784, Manufacturer=Microchip, Supplier Part Number 1=2368834P, Category="Interface ICs", ComponentLink1Description=LCSC, ComponentLink1URL=https://www.lcsc.com/product-detail/Security-Verification-Encryption-ICs_Microchip-Tech-ATECC608B-SSHDA-B_C5444784.html, Item Type=IC, Manufacturer Part Number=ATECC608B-SSHDA-B, Pricing 1="20=0.758, 50=0.704, 80=0.691 (GBP)", RoHS=Yes, Stock 1=590, Supplier 1=Rs
U10: "MOSFET P-CH 20V 3.6A 3LGA", Case/Package=LGA, Continuous Drain Current (ID)=3.6A, Drain to Source Voltage (Vdss)=20V, Input Capacitance=385pF, LCSC Part Number=C2872196, Manufacturer="Texas Instruments", Max Operating Temperature=150°C, Max Power Dissipation=500mW, Min Operating Temperature=-55°C, Supplier Part Number=595-CSD25501F3, Category="Integrated Circuits (ICs)", ComponentLink1Description=http://www.ti.com/lit/ds/symlink/csd25501f3.pdf?src-supplier=Digi-Key, ComponentLink1URL=http://www.ti.com/lit/ds/symlink/csd25501f3.pdf?src-supplier=Digi-Key, ComponentLink2Description=http://www.ti.com/general/docs/suppproductinfo.tsp?distId=10&amp;gotoUrl=http%3A%2F%2Fwww.ti.com%2Flit%2Fgpn%2Fcsd25501f3&src-supplier=Digi-Key, ComponentLink2URL=http://www.ti.com/general/docs/suppproductinfo.tsp?distId=10&amp;gotoUrl=http%3A%2F%2Fwww.ti.com%2Flit%2Fgpn%2Fcsd25501f3&src-supplier=Digi-Key, Element Configuration=Single, Item Type=IC, Manufacturer Part Number=CSD25501F3, Mounting Technology="Surface Mount", Packaging="Cut Tape", Pins=3, Pricing="1=0.45, 10=0.34, 50=0.34, 100=0.212, 1000=0.112, 10000=0.086 (USD)", Rds On Max=76mR, RoHS=Yes, RoHS Compliant=Yes, Series=FemtoFET™, Stock=42227, Supplier=Mouser
U11: "DFN-6-EP(3x3) Temperature and Humidity Sensor ROHS", LCSC Part Number=C83479, Manufacturer="TE Connectivity", Supplier Part Number=824-HTU21D, Category="Temperature and Humidity Sensors", ComponentLink1Description=http://www.farnell.com/datasheets/2207166.pdf?src-supplier=Farnell, ComponentLink1URL=http://www.farnell.com/datasheets/2207166.pdf?src-supplier=Farnell, ComponentLink2Description=https://datasheet.octopart.com/HTU21D-TE-Connectivity-datasheet-22149496.pdf?src-supplier=Farnell, ComponentLink2URL=https://datasheet.octopart.com/HTU21D-TE-Connectivity-datasheet-22149496.pdf?src-supplier=Farnell, ComponentLink3Description=https://datasheet.octopart.com/HTU21D-TE-Connectivity-datasheet-65793082.pdf?src-supplier=Element14, ComponentLink3URL=https://datasheet.octopart.com/HTU21D-TE-Connectivity-datasheet-65793082.pdf?src-supplier=Element14, ComponentLink4Description=https://datasheet.octopart.com/HTU21D-TE-Connectivity-datasheet-41524056.pdf?src-supplier=Newark, ComponentLink4URL=https://datasheet.octopart.com/HTU21D-TE-Connectivity-datasheet-41524056.pdf?src-supplier=Newark, Item Type=IC, Manufacturer Part Number=HTU21D, Pricing="1=8.23, 10=5.36, 50=5.36, 100=4.48, 400=3.75, 800=3.5, 1000=3.5, 2400=3.38, 4800=3.26, 10000=3.21, 24800=3.14 (USD)", RoHS=Yes, Stock=15840, Supplier=Mouser
U12: "IC XPNDR 1.7MHZ I2C 28SSOP", Case/Package=SSOP, Clock Frequency=10MHz, Frequency=1.7MHz, LCSC Part Number=C558584, Manufacturer=Microchip, Max Operating Temperature=125°C, Min Operating Temperature=-40°C, Nominal Supply Voltage=5.5V, Output Current=25mA, Package Quantity=2100, Power Dissipation=700mW, Supplier Part Number 1=MCP23017T-E/SSCT-ND, Supply Current=1mA, Category="Interface ICs", ComponentLink1Description=https://datasheet.ciiva.com/12267/21952b-12267583.pdf?src-supplier=Mouser, ComponentLink1URL=https://datasheet.ciiva.com/12267/21952b-12267583.pdf?src-supplier=Mouser, ComponentLink2Description=https://datasheet.ciiva.com/8128/21952b-8128586.pdf?src-supplier=Avnet, ComponentLink2URL=https://datasheet.ciiva.com/8128/21952b-8128586.pdf?src-supplier=Avnet, ComponentLink3Description=https://datasheet.ciiva.com/16454/filehandler-aspxddocname-en023709-16454267.pdf?src-supplier=Future+Electronics, ComponentLink3URL=https://datasheet.ciiva.com/16454/filehandler-aspxddocname-en023709-16454267.pdf?src-supplier=Future+Electronics, ComponentLink4Description=https://datasheet.ciiva.com/1780/21952b-1780738.pdf?src-supplier=Digi-Key, ComponentLink4URL=https://datasheet.ciiva.com/1780/21952b-1780738.pdf?src-supplier=Digi-Key, Interface=I2C,Serial, Item Type=IC, Lead Free="Lead Free", Manufacturer Part Number=MCP23017T-E/SS, Mounting Technology="Surface Mount", Number of Bits=16, Number of Channels=1, Number of I/Os=16, Operating Supply Voltage=5.5V, Output Type=PUSH-PULL, Packaging="Tape and Reel", Pins=28, Pricing 1="1=1.69, 25=1.4, 100=1.28 (USD)", RoHS=Yes, RoHS Compliant=Yes, Series=-, Stock 1=26314, Supplier 1=Digi-Key
U13: "Active Low 1 VSOF-5 Monitors & Reset Circuits ROHS", Case/Package=VSOF, LCSC Part Number=C2067200, Manufacturer=Rohm, Max Operating Temperature=105°C, Max Power Dissipation=210mW, Max Reset Threshold Voltage=6.09V, Max Supply Current=1.98uA, Max Supply Voltage=10V, Min Operating Temperature=-40°C, Min Reset Threshold Voltage=5.91V, Min Supply Voltage=1.2V, Number of Voltages Monitored=1, Operating Supply Current=900nA, Package Quantity=3000, Supplier Part Number 1=1717448, Threshold Voltage=6V, Accuracy=1%, Category="Voltage Supervisors", ComponentLink1Description=https://datasheet.ciiva.com/1974/bd48xxg-e-1974994.pdf?src-supplier=Digi-Key, ComponentLink1URL=https://datasheet.ciiva.com/1974/bd48xxg-e-1974994.pdf?src-supplier=Digi-Key, ComponentLink2Description=https://datasheet.ciiva.com/8133/bd48xxg-e-8133113.pdf?src-supplier=Avnet, ComponentLink2URL=https://datasheet.ciiva.com/8133/bd48xxg-e-8133113.pdf?src-supplier=Avnet, ComponentLink3Description=LCSC, ComponentLink3URL=https://www.lcsc.com/product-detail/Monitors-Reset-Circuits_ROHM-Semicon-BD4830FVE-TR_C2067200.html, Item Type=IC, Lead Free="Lead Free", Manufacturer Part Number=BD4830FVE-TR, Mounting Technology="Surface Mount", Number of Monitored Inputs=1, Packaging="Tape and Reel", Pins=5, Pricing 1="1=0.64000, 10=0.54900, 25=0.51200, 100=0.40960, 250=0.38032, 500=0.32182, 1000=0.24868 (USD)", Reset="Active Low", RoHS=Yes, RoHS Compliant=Yes, Series=BD48xxx, Stock 1=5990, Supplier 1=Rs, Type="Simple Reset/Power-On Reset,Voltage Detector", Watchdog Timer=No
U14: "SENSOR RH PRESSURE TEMP VOC", LCSC Part Number=C125972, Manufacturer="Bosch Sensortec", Max Operating Temperature=85°C, Min Operating Temperature=-40°C, Supplier Part Number 1=7107186, Category=Uncategorized, ComponentLink1Description=https://ae-bst.resource.bosch.com/media/_tech/media/application_notes/BST-BME680-HS000-05.pdf?src-supplier=Digi-Key, ComponentLink1URL=https://ae-bst.resource.bosch.com/media/_tech/media/application_notes/BST-BME680-HS000-05.pdf?src-supplier=Digi-Key, ComponentLink2Description=https://ae-bst.resource.bosch.com/media/_tech/media/product_flyer/BST-BME680-FL000.pdf?src-supplier=Digi-Key, ComponentLink2URL=https://ae-bst.resource.bosch.com/media/_tech/media/product_flyer/BST-BME680-FL000.pdf?src-supplier=Digi-Key, Item Type="Temperature Sensor", Manufacturer Part Number=BME680, Output Type=SPI,I2C, Pricing 1="1=9.84000, 20=8.81000, 125=8.18000, 500=7.71000, 3000=7.09000 (USD)", RoHS=No, Sensor Type=Temperature, Stock 1=64, Supplier 1="Future Electronics"
X1: library part X322540MPB4SI, "40MHz SMD Crystal Resonator 15pF SMD3225-4P Crystals ROHS", LCSC Part Number=C9010, Manufacturer="Yangxing Tech", ComponentLink1Description=LCSC, ComponentLink1URL=https://www.lcsc.com/product-detail/Crystals_Yangxing-Tech-X322540MPB4SI_C9010.html, Item Type=Crystal, Manufacturer Part Number=X322540MPB4SI

## Free pads (board coordinates)
  round 0 hole 5 unplated: MH(54.8,107.803)
  round 0 hole 3 unplated: MH0(0,107.047) MH0(0,0) MH0(72.924,84.793) MH0(72.924,0)

## Via types
v1: diameter 0.6, hole 0.3, Top Layer to Bottom Layer, 300 vias

## Nets (pads, with @x,y where several pads share a name; then routed paths per layer and width w, separated by ;. In a path a pad name is that pad's centre, name@x,y a point inside that pad or via, vN(x,y) a via of type N, cw(c..) or ccw(c..) an arc to the next point about the centre after c; other vN are vias at no path point)
3V3: C24.2 C25.2 C26.2 C27.2 C28.2 C29.2 C30.2 C31.2 C33.2 C34.2 C39.2 C43.1 C46.1 C47.2 C48.1 D5.1 D7.1 D8.1 J3.2 J4.2 J6.2 J7.2 J9.17 J10.1 J12.6 J12.24 J12.52 K1.5 K2.5 L3.2 L4.1 LS1.1 P8.1 R25.2 R27.2 R28.2 R29.2 R32.2 R33.2 R34.2 R35.2 R36.2 R43.2 U6.1 U8.20 U8.46 U8.55 U8.56 U9.8 U11.5 U12.9 U12.16 U14.2 U14.6 U14.8 | length 514.4
  Top Layer w0.203: U8.46@21.552,58.44 21.552,59.359 22.105,59.912 22.862,59.912 23.063,60.113 C26.2@23.063,60.925 23.472,60.925 ccw(c23.472,61.293) 23.839,61.293 23.839,63.712 cw(c24.763,63.712) 24.763,64.636 v1(26.162,64.636)
  Top Layer w0.254: U8.20@19.552,51.59 19.552,50.012 18.007,48.468 15.361,48.468 14.716,47.823 14.716,43.285 16.663,41.339 17.548,41.339 v1(17.561,41.326) 23.543,41.326 24.089,41.871 24.089,45.581 23.425,46.245 23.425,46.656 C39.2@23.341,46.739 ; v1(49.741,67.542) 49.741,69.058 50.246,69.563 63.608,69.563 64.337,70.292 64.337,74.307 62.847,75.797 R43.2@61.482,75.797 61.482,75.747 61.857,75.372 U12.16@61.857,74.047
  Top Layer w0.305: v1(-2.368,12.678) C46.1@-2.368,13.389 U14.8@-2.368,14.466 -2.368,15.192 -2.14,15.421 -1.022,15.421 -0.768,15.167 U14.6@-0.768,14.466 ; R25.2@10.318,73.867 C25.2@12.677,73.867 ; D5.1@10.573,53.439 11.741,53.439 12.351,52.83 R34.2@13.203,52.83 13.205,52.828 14.128,52.828 R35.2@14.129,52.827 R36.2@15.029,52.827 ; v1(15.524,60.395) C28.2@15.524,59.837 C27.2@15.524,58.837 17.284,58.837 17.672,58.45 ; U12.9@59.257,67.247 59.315,67.19 59.315,66.075 cw(c58.659,66.075) C43.1@59.123,65.612 59.123,64.912 60.141,63.893 J12.24@60.141,62.178
  Top Layer w0.33: 10.619,55.502 R29.2@11.589,55.502
  Top Layer w0.381: U14.2@-1.568,16.866 -1.498,16.936 -1.498,18.183 C47.2@-1.429,18.252 v1(-1.429,18.977) -1.429,22.17 -0.768,22.83 v1(0.254,22.83) ; v1(-1.168,5.769) C48.1@-1.168,6.531 U11.5@-1.168,7.721 ; J10.1@10.843,64.636 v1(11.963,64.636) ; C39.2@23.341,46.739 R32.2@23.341,47.666 R33.2@24.359,47.666 ; v1(29.246,30.852) J9.17@30.488,30.852
  Top Layer w0.508: D5.1@10.573,53.439 C29.2@10.573,54.952 10.573,55.457 ; 10.619,55.502 10.573,55.457 ; L4.1@12.041,56.969 C31.2@10.573,56.969 C30.2@10.573,55.961 10.573,55.457 ; v1(26.162,61.979) 26.162,58.163 26.578,57.747 C34.2@27.061,57.747 ; R28.2@27.061,54.924 R27.2@27.061,55.904 C34.2@27.061,57.747 ; U9.8@30.055,57.747 C33.2@28.345,57.747 C34.2@27.061,57.747 ; D7.1@48.823,23.299 K1.5@51.633,23.299 ; D8.1@48.823,38.908 K2.5@51.633,38.908 ; J12.6@49.741,62.178 v1(49.741,67.542) ; v1(60.141,60.909) 60.144,60.912 60.144,62.175 J12.24@60.141,62.178 ; v1(69.002,60.406) 70.97,60.406 71.341,60.777 J12.52@71.341,62.178 ; J12.52@71.345,62.182 71.345,63.877 v1(71.349,63.881)
  Top Layer w0.635: P8.1@13.65,71.648 13.65,73.676 13.84,73.867 C24.2@14.612,73.867
  Top Layer w0.762: v1(0.254,21.583) v1(0.254,22.83) 0.254,23.433 LS1.1@0.254,25.905
  Top Layer w0.889: P8.1@13.65,71.648 23.749,71.648 26.162,69.235 v1(26.162,64.636) 38.674,64.636 v1(41.58,67.542)
  Top Layer w1: LS1.1@0.127,26.055 0.127,27.265 ; LS1.1@0.254,25.905 0.404,26.055 LS1.1@1.198,26.055
  Bottom Layer w0.305: 9.862,61.276 10.743,60.395 v1(15.524,60.395)
  Bottom Layer w0.381: v1(-1.429,18.977) -1.429,18.186 -2.368,17.246 v1(-2.368,12.678) -2.368,7.563 -1.168,6.363 v1(-1.168,5.769) ; 9.862,65.467 10.693,64.636 v1(11.963,64.636)
  Bottom Layer w0.508: v1(14.612,72.85) v1(12.677,72.85) 10.475,72.85 9.862,72.237 9.862,65.467 9.862,61.276 v1(9.862,52.83) 9.862,52.805 9.268,52.21 9.268,43.082 ; v1(17.561,41.326) 11.024,41.326 9.268,43.082 ; v1(29.246,30.852) 16.289,30.852 9.268,37.874 9.268,43.082 ; v1(60.141,60.909) 60.141,58.272 60.779,57.634 66.23,57.634 v1(69.002,60.406) ; v1(71.349,63.881) 73.695,63.881 73.715,63.861
  Bottom Layer w0.762: v1(0.254,21.583) v1(0.254,22.83) 2.757,22.83 3.691,21.897 3.691,14.635 4.732,13.594 J3.2@9.569,13.594 9.569,11.822 10.447,10.944 25.486,10.944 26.248,11.706 26.248,11.822 ; v1(26.162,61.979) v1(26.162,64.636) ; J6.2@26.248,13.594 26.248,11.822 ; v1(41.58,67.542) v1(49.741,67.542) 49.741,79.2 50.714,80.172 72.728,80.172 73.715,79.185 73.715,63.861 73.715,53.524 71.135,50.945 49.849,50.945 48.336,49.432 48.336,40.079 ; J4.2@42.928,13.594 42.928,11.706 ; K2.5@51.633,38.908 49.508,38.908 48.336,40.079 ; J7.2@59.538,13.594 52.548,13.594 51.633,14.509 K1.5@51.633,23.299 49.325,23.299 48.336,24.289 48.336,40.079 ; J7.2@59.607,13.594 59.607,11.822 58.729,10.944 43.69,10.944 42.928,11.706 ; 26.248,11.822 27.126,10.944 42.166,10.944 42.928,11.706
3V9: C18.2 C22.2 C23.2 J9.18 J12.2 P7.1 R23.2 U5.4 U5.5 U6.2 U6.3 | length 77.9
  Top Layer w0.508: P7.1@29.877,71.648 v1(29.877,73.586) C18.2@29.877,74.696 ; v1(30.488,29.794) J9.18@30.488,30.247 ; v1(37.552,37.456) 39.802,39.705 39.802,64.265 v1(41.859,66.322) ; J12.2@48.141,62.178 v1(48.141,66.322)
  Bottom Layer w0.508: v1(29.049,73.586) v1(29.877,73.586) v1(30.757,73.586) 34.914,73.586 35.458,73.041 35.458,67.288 36.424,66.322 v1(41.859,66.322) v1(48.141,66.322) ; v1(30.488,29.794) 36.474,29.794 37.552,30.872 v1(37.552,37.456)
5V: D2.1 D3.1 P3.1 Q1.2 R14.2 R47.2 U1.1 U1.2 U1.5 U1.6 U1.8 | length 39.8
  Top Layer w0.381: D3.1@10.444,105.712 P3.1@10.444,109.3
  Top Layer w0.508: R14.2@35.763,104.676 v1(36.446,104.676)
  Bottom Layer w0.508: v1(13.183,105.712) 17.922,105.712 21.916,109.706 38.758,109.706 39.802,108.662 39.802,105.587 38.884,104.668 36.454,104.668 v1(36.446,104.676)
5V_POE: D3.2 J12.46 J12.48 P1.1 Q1.1 R22.2 | length 103.4
  Top Layer w0.508: D3.2@10.85,101.712 D3.2@10.876,101.738
  Top Layer w0.889: 37.16,107.826 46.457,107.826 48.26,106.023 48.26,90.554 50.292,88.522 67.056,88.522 69.35,86.228 69.35,61.696
  Bottom Layer w0.762: v1(36.848,108.318) 36.958,108.318 37.422,107.854
  Bottom Layer w0.889: v1(12.065,101.73) 15.747,101.73 22.73,108.713 35.461,108.713 35.855,108.318 v1(36.848,108.318)
  other v1: 12.065,100.714 12.065,102.746 36.848,107.318 37.998,107.318 37.998,108.334
5V_USB: FB1.2 P2.1 Q1.3 | length 5.6
  Top Layer w0.381: Q1.3@5.364,103.712 P2.1@5.364,109.3
ACSET: R6.1 R9.2 U4.17 | length 9
  Top Layer w0.203: v1(30.406,99.479) cw(c30.009,99.082) 30.57,99.082 U4.17@30.57,98.378
  Top Layer w0.635: R9.2@33.379,100.439 R6.1@34.496,100.439 34.499,100.437 v1(35.179,100.437)
  Bottom Layer w0.635: v1(30.406,99.479) 30.923,98.961 34.514,98.961 35.179,99.627 v1(35.179,100.437)
AVCC: C8.1 R13.2 U4.4 | length 8.4
  Top Layer w0.203: v1(27.93,93.691) 28.388,93.691 28.57,93.873 U4.4@28.57,94.928
  Top Layer w0.508: R13.2@21.476,93.691 C8.1@22.86,93.691 23.389,93.691 23.528,93.551 v1(23.553,93.551)
  Bottom Layer w0.381: v1@27.871,93.691 v1(27.93,93.691)
  Bottom Layer w0.508: v1(23.553,93.551) 27.593,93.551 ccw(c27.593,94.028) v1(27.93,93.691)
BACKLIGHT_CONTROL: J9.2 U8.43 | length 49.4
  Top Layer w0.254: U8.43@22.752,58.44 24.323,58.44 25.207,59.323 25.207,62.041 25.799,62.633 36.163,62.633 36.83,61.966 36.83,57.599 38.685,55.745 38.685,40.924 37.511,39.751 v1(34.239,39.751)
  Top Layer w0.305: J9.2@30.488,38.352 31.082,38.352 31.344,38.614 v1(31.344,39.751)
  Bottom Layer w0.305: v1(31.344,39.751) v1(34.239,39.751)
BAT_ADC: C42.1 D6.2 R37.2 R40.1 U8.22 | length 5.1
  Top Layer w0.254: R37.2@20.352,46.502 U8.22@20.352,51.59
BAT_STAT: R39.1 U8.21 | length 6.5
  Top Layer w0.254: 19.042,47.595 19.442,47.595 19.952,48.105 U8.21@19.952,51.59
  Top Layer w0.381: R39.1@17.112,47.595 19.042,47.595
BTN1: J9.14 R34.1 U8.6 | length 43.5
  Top Layer w0.203: R34.1@13.203,53.38 v1(13.203,53.892) 13.203,55.033 13.541,55.371 15.308,55.371 15.552,55.615 U8.6@16.727,55.615
  Top Layer w0.305: v1(26.899,34.239) 26.899,32.842 27.388,32.352 J9.14@30.488,32.352
  Bottom Layer w0.254: v1(13.203,53.892) 12.166,52.854 12.166,45.704 13.404,44.466 24.794,44.466 26.408,42.853 26.408,34.73 v1(26.899,34.239)
BTN2: J9.13 R35.1 U8.7 | length 42.8
  Top Layer w0.203: R35.1@14.129,53.377 v1(14.129,53.889) 14.129,54.734 14.426,55.031 15.517,55.031 15.701,55.215 U8.7@16.727,55.215
  Top Layer w0.305: J9.13@30.488,32.852 v1(31.648,32.852)
  Bottom Layer w0.254: v1(14.129,53.889) 12.666,52.426 12.666,46.062 13.767,44.961 25.074,44.961 26.931,43.104 26.931,35.223 29.301,32.852 v1(31.648,32.852)
BTN3: J9.12 R36.1 U8.9 | length 43.5
  Top Layer w0.203: U8.9@16.718,54.406 U8.9@16.727,54.415
  Top Layer w0.254: R36.1@15.029,53.377 v1(15.029,54.415) U8.9@16.727,54.415
  Top Layer w0.305: v1(27.788,33.352) J9.12@30.488,33.352
  Bottom Layer w0.254: v1(15.029,54.415) 14.669,54.775 13.058,54.775 11.684,53.401 11.684,45.486 13.153,44.016 24.538,44.016 25.903,42.651 25.903,34.244 26.795,33.352 v1(27.788,33.352)
BUCK_EN: C45.2 R11.1 U5.12 U13.1 | length 8.8
  Top Layer w0.254: U5.12@38.854,75.467 v1(39.929,75.467)
  Top Layer w0.305: U13.1@38.016,80.136 R11.1@39.279,80.136 39.279,80.538 ; C45.2@39.279,80.883 39.279,80.538 ; v1(39.929,80.538) 39.279,80.538
  Bottom Layer w0.381: v1(39.929,75.467) v1(39.929,80.538)
BUZZER: R44.1 U8.27 | length 46.8